# Altium PCB VHF_AMP.PCBDOC (part 6 of 7)
Units mm, origin at the board's own origin, x right, y up, seen from the top; angles counter-clockwise.
Board outline 222.47 x 100.01 mm, 4 copper layers (Top Layer, Int1 (GND), Int2 (PWR), Bottom Layer), stack 1.508 mm thick; 513 components, 284 nets, 1695 pads, 984 vias.
Unrouted connection lines stored in the file: 110.
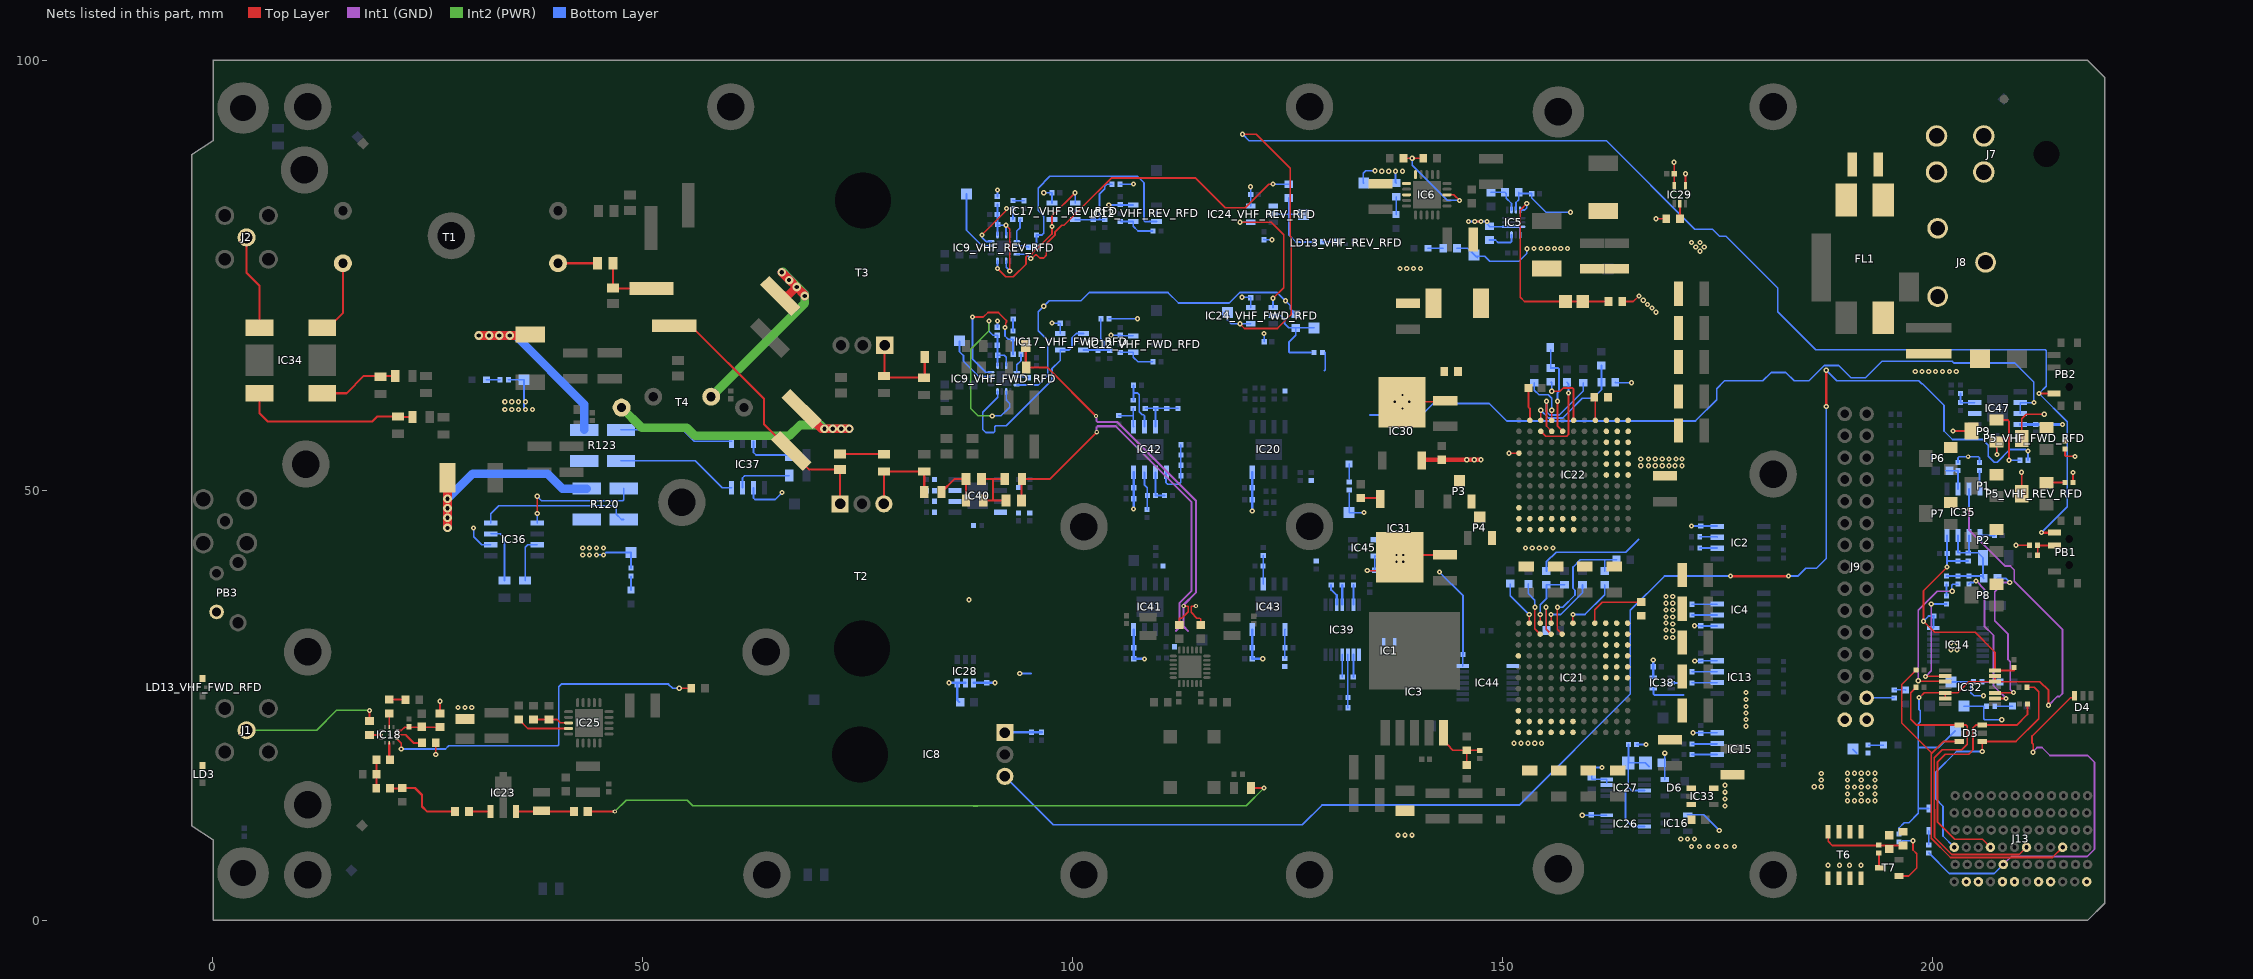
[diagram p6: the nets of this part, all layers, seen from the top]

## Via types
v1: diameter 0.6, hole 0.25, Top Layer to Bottom Layer, tented both sides, 878 vias
v2: diameter 0.6, hole 0.25, Top Layer to Bottom Layer, tented top, 61 vias
v3: diameter 0.5, hole 0.25, Top Layer to Bottom Layer, tented top, 27 vias
v4: diameter 1, hole 0.5, Top Layer to Bottom Layer, tented both sides, 16 vias
v5: diameter 0.5, hole 0.25, Top Layer to Bottom Layer, tented both sides, 2 vias

## Nets (pads, with @x,y where several pads share a name; then routed paths per layer and width w, separated by ;. In a path a pad name is that pad's centre, name@x,y a point inside that pad or via, vN(x,y) a via of type N, cw(c..) or ccw(c..) an arc to the next point about the centre after c; other vN are vias at no path point) (continued)
NetC53_VHF_REV_RFD_2: C53_VHF_REV_RFD.2 IC12_VHF_REV_RFD.3 R24_VHF_REV_RFD.2 | length 26.9
  Bottom Layer w0.2: R24_VHF_REV_RFD.2@95.857,78.279 C53_VHF_REV_RFD.2@95.857,79.694 96.488,79.694 96.7,79.906 96.7,81.874 96.042,82.532 96.042,85.135 97.406,86.5 107.6,86.5 108.357,85.743 108.357,81.378 108.474,81.261 IC12_VHF_REV_RFD.3@109.806,81.261
NetC54_VHF_FWD_RFD_1: C54_VHF_FWD_RFD.1 IC9_VHF_FWD_RFD.4 R31_VHF_FWD_RFD.2 | length 17
  Top Layer w0.2: v1(88.4,70.144) 89.673,70.144 90.205,70.676 91.424,70.676 92.365,69.735 92.365,69.535 92.271,69.441 92.271,69.019 v1(92.194,68.942)
  Bottom Layer w0.2: v1(88.4,70.144) 88.4,65.302 89.963,63.739 IC9_VHF_FWD_RFD.4@90.569,63.739 ; v1(92.194,68.942) 92.194,67.938 92.566,67.566 R31_VHF_FWD_RFD.2@93.125,67.566 C54_VHF_FWD_RFD.1@93.125,65.8
NetC54_VHF_FWD_RFD_2: C54_VHF_FWD_RFD.2 IC9_VHF_FWD_RFD.9 | length 2.3
  Bottom Layer w0.2: IC9_VHF_FWD_RFD.9@93.569,63.739 93.569,64.583 94.05,65.065 C54_VHF_FWD_RFD.2@94.05,65.8
NetC54_VHF_REV_RFD_1: C54_VHF_REV_RFD.1 IC9_VHF_REV_RFD.4 R31_VHF_REV_RFD.2 | length 7.9
  Top Layer w0.2: v1(89.5,79.689) 92.312,82.501 92.312,82.736 v1(92.35,82.774)
  Bottom Layer w0.2: v1(89.5,79.689) 89.538,79.651 89.538,79.364 89.963,78.939 IC9_VHF_REV_RFD.4@90.569,78.939 ; v1(92.35,82.774) 92.358,82.766 R31_VHF_REV_RFD.2@93.125,82.766 93.125,81.521 C54_VHF_REV_RFD.1@93.094,81.489
NetC54_VHF_REV_RFD_2: C54_VHF_REV_RFD.2 IC9_VHF_REV_RFD.9 | length 2.7
  Bottom Layer w0.2: IC9_VHF_REV_RFD.9@93.569,78.939 93.569,80.144 93.944,80.519 93.944,81.439 C54_VHF_REV_RFD.2@93.994,81.489
NetC55_VHF_FWD_RFD_1: C55_VHF_FWD_RFD.1 R31_VHF_FWD_RFD.1 | length 1.5
  Bottom Layer w0.2: R31_VHF_FWD_RFD.1@93.157,68.474 R31_VHF_FWD_RFD.1@93.125,68.506 93.125,69.924 C55_VHF_FWD_RFD.1@93.157,69.924
NetC55_VHF_REV_RFD_1: C55_VHF_REV_RFD.1 R31_VHF_REV_RFD.1 | length 1.3
  Bottom Layer w0.2: R31_VHF_REV_RFD.1@93.125,83.706 93.157,83.674 C55_VHF_REV_RFD.1@94.4,83.674
NetC59_VHF_FWD_RFD_2: C59_VHF_FWD_RFD.2 C60_VHF_FWD_RFD.1 FB2_VHF_FWD_RFD.2 IC9_VHF_FWD_RFD.5 IC9_VHF_FWD_RFD.7 IC9_VHF_FWD_RFD.14 | length 26.3
  Int2 (PWR) w0.2: v1(90.311,69.688) 90.311,68.53 88.2,66.419 88.2,59.51 89.057,58.654 v1(90.7,58.654)
  Bottom Layer w0.2: v1(90.311,69.688) 90.311,68.522 90.796,68.036 FB2_VHF_FWD_RFD.2@91.306,68.036 91.319,68.024 IC9_VHF_FWD_RFD.5@91.319,64.489 ; v1(90.7,58.654) 91.731,58.654 92.738,59.661 92.738,60.096 92.369,60.466 92.369,60.602 92.319,60.652 IC9_VHF_FWD_RFD.14@92.319,61.489 ; C59_VHF_FWD_RFD.2@91.35,65.7 92.1,65.7 92.319,65.481 IC9_VHF_FWD_RFD.7@92.319,64.489
NetC59_VHF_REV_RFD_2: C59_VHF_REV_RFD.2 C60_VHF_REV_RFD.1 FB2_VHF_REV_RFD.2 IC9_VHF_REV_RFD.5 IC9_VHF_REV_RFD.7 IC9_VHF_REV_RFD.14 | length 12.5
  Top Layer w0.2: v1(92.299,80.816) 92.738,80.377 v1(92.738,75.517)
  Bottom Layer w0.2: FB2_VHF_REV_RFD.2@91.306,83.236 91.319,83.224 IC9_VHF_REV_RFD.5@91.319,79.689 ; C59_VHF_REV_RFD.2@91.35,80.9 91.434,80.816 v1(92.299,80.816) 92.299,79.709 IC9_VHF_REV_RFD.7@92.319,79.689 ; IC9_VHF_REV_RFD.14@92.319,76.689 92.319,75.926 92.738,75.507 v1(92.738,75.517)
NetC72_1: C72.1 R15.2 | length 5.1
  Top Layer w0.245: C72.1@73,54.2 R15.2@78.1,54.2
NetC72_2: C72.2 L14.1 L18.1 T2.1 | length 31.9
  Top Layer w0.245: L18.1@53.705,69.136 55.664,69.136 64.172,60.628 64.172,57.674 67.179,54.666 69.445,52.4 C72.2@73,52.4 73,48.444 T2.1@73.02,48.424
NetC73_1: C73.1 C146.2 L18.2 | length 5.6
  Top Layer w0.245: C73.1@46.6,76.4 46.6,73.456 L18.2@49.251,73.456
NetC73_2: C73.2 T1.3 | length 4
  Top Layer w0.245: T1.3@40.219,76.4 44.2,76.4
NetC74_2: C74.2 C78.1 R19.2 R20.1 | length 7.7
  Top Layer w0.245: C78.1@89.46,51.296 90.81,51.296 ; R20.1@89.66,48.796 90.91,48.796 ; C74.2@92.16,48.796 90.91,48.796 ; R19.2@92.16,51.296 90.81,51.296 ; 90.81,51.296 90.81,48.896 90.91,48.796
NetC77_2: C77.2 IC25.14 | length 6.2
  Top Layer w0.2: C77.2@35.643,23.359 36.693,22.309 IC25.14@41.443,22.309
NetC78_2: C78.2 R18.1 R20.2 | length 6
  Top Layer w0.245: R18.1@84.8,49.8 86.296,51.296 C78.2@87.66,51.296 R20.2@87.66,48.796
NetC79_1: C79.1 FL1.3 J7.1 J7.2 J8.2 J8.3
NetC79_2: C79.2 FL1.1 J7.3 J7.4 J8.1
NetC89_2: C89.2 C90.2 IC18.9 L6.1 | length 4.8
  Top Layer w0.2: IC18.9@21.518,22.064 21.993,22.064 22.393,22.464 22.893,22.464 24.393,22.464 L6.1@26.193,22.464
NetC93_1: C93.1 R134.2 R137.2 | length 9.5
  Top Layer w0.245: R134.2@20.693,15.334 22.043,15.334 R137.2@22.093,15.384 23.579,15.384 24.393,14.569 24.393,13.235 24.993,12.635 ; 24.993,12.656 C93.1@28.251,12.656
NetC93_2: C93.2 IC23.1 | length 2.5
  Top Layer w0.245: C93.2@29.851,12.656 IC23.1@32.351,12.656
NetC95_1: C95.1 IC18.11 | length 1.6
  Top Layer w0.2: IC18.11@20.593,22.489 C95.1@20.593,24.064
NetC95_2: C95.2 R95.1 | length 1.9
  Top Layer w0.2: C95.2@20.593,25.664 R95.1@22.493,25.664
NetC96_1: C96.1 J1.1 | length 16.5
  Top Layer w0.245: C96.1@18.293,23.159 v1(18.293,24.414)
  Int2 (PWR) w0.2: J1.1@4,22.1 12.15,22.1 14.464,24.414 v1(18.293,24.414)
NetC96_2: C96.2 IC18.2 | length 1.4
  Top Layer w0.2: C96.2@18.293,21.559 C96.2@18.298,21.564
  Top Layer w0.245: C96.2@18.298,21.564 IC18.2@19.668,21.564
NetC99_1: C99.1 R51.1 R72.2 T6.4 | length 10
  Top Layer w0.2: T6.4@187.895,10.3 187.895,9.188 188.383,8.7 R51.1@196.6,8.7
NetC100_1: C100.1 IC18.5 | length 2
  Top Layer w0.2: C100.1@20.593,18.764 C100.1@20.693,18.664
  Top Layer w0.245: C100.1@20.593,18.764 IC18.5@20.593,20.639
NetC100_2: C100.2 R127.2 R134.1 | length 3.3
  Top Layer w0.245: R134.1@19.093,15.334 C100.2@19.093,18.664
NetC102_1: C102.1 IC23.3 L1.1 | length 6.7
  Top Layer w0.245: IC23.3@35.351,12.656 38.318,12.656 C102.1@42.067,12.656
NetC102_2: C102.2 R101.2 | length 81.8
  Top Layer w0.245: C102.2@43.667,12.656 v3(46.824,12.656) ; R101.2@120.808,15.38 v1(122.308,15.38)
  Int2 (PWR) w0.2: v3(46.824,12.656) 48.139,13.971 55.229,13.971 55.885,13.315 88.491,13.315 88.501,13.305 88.999,13.305 89.009,13.315 120.243,13.315 v1(122.308,15.38)
NetC111_2: C111.2 IC22.K1 | length 3.9
  Top Layer w0.152: C111.2@153.14,62.299 C111.2@153.15,62.289
  Top Layer w0.2: C111.2@153.06,61.9 153.06,59.66 153.22,59.5 IC22.K1@153.22,58.13
NetC122_2: C122.2 IC21.K1 | length 5.5
  Top Layer w0.152: IC21.K1@153.15,34.55 v1(153.15,35.553)
  Bottom Layer w0.152: C122.2@150.94,39.16 150.94,37.763 v1(153.15,35.553)
NetC133_2: C133.2 IC21.J2 | length 6.4
  Top Layer w0.152: v1(153.8,36.4) 153.8,33.9 IC21.J2@154.42,33.28
  Bottom Layer w0.2: C133.2@153.04,39.11 153.04,37.994 153.8,37.234 v1(153.8,36.4)
NetC136_2: C136.2 IC22.J2 | length 9.7
  Top Layer w0.2: IC22.J2@154.49,56.86 155.065,56.285 157.5,56.285 157.7,56.485 v1(157.7,61.3)
  Bottom Layer w0.2: C136.2@157.54,62.56 157.7,62.4 v1(157.7,61.3)
NetC138_2: C138.2 IC35.6 IC35.7 R146.1 R147.1 R148.1 R149.1 R150.1 R152.1 | length 14
  Bottom Layer w0.2: R149.1@201.651,40.023 R148.1@203.001,40.023 R147.1@204.271,40.023 205.731,40.023 R146.1@205.901,39.853 ; IC35.7@203.001,44.753 R152.1@203.001,42.723 R150.1@204.201,42.723 ; IC35.6@204.271,44.753 204.271,42.793 R150.1@204.201,42.723 ; R146.1@206.001,39.753 R146.1@205.901,39.853 ; R150.1@204.201,42.723 205.331,42.723 C138.2@205.901,42.153 R146.1@205.901,39.853
NetC140_2: C140.2 IC35.2 R155.2 | length 3.5
  Bottom Layer w0.2: C140.2@201.651,52.283 R155.2@203.001,52.283 IC35.2@203.001,50.153
NetC141_2: C141.2 IC35.5 | length 1.7
  Bottom Layer w0.2: IC35.5@205.541,44.753 C141.2@207.251,44.753
NetD2_1: D2.1 R142.1 | length 1.6
  Bottom Layer w0.2: R142.1@199.6,8.78 D2.1@199.6,10.4
NetD3_1: D3.1 J13.F3 R141.2 | length 38.6
  Top Layer w0.2: R141.2@198.13,27.1 197.5,26.47 197.5,23.4 198.2,22.7 203.968,22.7 204.086,22.583 204.086,20.491 203.415,19.821 201.176,19.821 200.246,18.891 200.246,12.921 200.273,12.895 200.273,9.655 202.274,7.653 210.126,7.653 J13.F3@210.966,8.493
NetD3_3: D3.3 J13.C3 R140.2 | length 42.2
  Top Layer w0.2: R140.2@198.13,29.1 196.45,27.42 196.45,22.95 199.888,19.512 199.888,19.348 ; D3.3@203.12,20.8 201.339,20.8 199.888,19.348 ; J13.C3@215.166,8.493 213.976,7.303 202.129,7.303 199.888,9.545 199.888,19.348
NetD3_4: D3.4 J13.L3 R144.2 | length 29.6
  Top Layer w0.2: v1(205.82,19.625) D3.4@205.82,20.8 209.748,20.8 212.4,23.452 212.4,26.579 211.879,27.1 R144.2@211.04,27.1
  Bottom Layer w0.2: J13.L3@202.566,8.493 201.255,9.804 201.255,13.274 200.4,14.129 200.4,17.206 202.82,19.625 v1(205.82,19.625)
NetD3_6: D3.6 J13.I3 R143.2 | length 29.8
  Top Layer w0.2: J13.I3@206.766,8.493 205.841,9.418 202.61,9.418 200.623,11.405 200.623,18.442 201.5,19.32 204.244,19.32 204.745,19.821 204.745,22.375 205.07,22.7 D3.6@205.82,22.7 209.836,22.7 211.07,23.934 R143.2@211.07,25.15
NetD4_6: D4.6 J13.H2 R142.2 | length 48.5
  Top Layer w0.2: v1(211.733,19.538) 211.733,20.476 211.614,20.596 211.614,21.426 216.08,25.892 216.363,25.892 216.563,26.092 D4.6@216.563,26.123
  Int1 (GND) w0.2: J13.H2@208.266,6.493 209.186,7.413 218.018,7.413 218.866,8.262 218.866,18.365 218.075,19.157 213.7,19.157 212.766,20.091 212.192,20.091 211.733,19.632 v1(211.733,19.538)
  Bottom Layer w0.2: R142.2@199.6,7.84 201.99,5.45 207.223,5.45 J13.H2@208.266,6.493
NetIC1_4: IC1.4 IC39.1
NetIC2_6: IC2.6 R37.2 | length 2.1
  Bottom Layer w0.2: R37.2@172.97,43.3 175,43.3 IC2.6@175,43.265
NetIC2_7: IC2.7 R35.2 | length 2.1
  Bottom Layer w0.2: R35.2@172.97,44.6 175,44.6 IC2.7@175,44.535
NetIC3_5: IC3.5 R42.1 R43.1 R46.2 | length 7.3
  Top Layer w0.152: IC3.5@143.2,21.8 143.2,20.85 143.649,20.401 144.265,19.785 R43.1@145.9,19.785 ; R42.1@145.9,18.05 R43.1@145.9,19.785 ; R46.2@147.4,19.77 145.915,19.77 R43.1@145.9,19.785
NetIC4_2: IC4.2 R16.2 | length 2.9
  Bottom Layer w0.2: R16.2@172.07,35.5 172.074,35.496 IC4.2@175,35.496
NetIC4_3: IC4.3 R158.2 | length 2.9
  Bottom Layer w0.2: R158.2@172.07,36.766 IC4.3@175,36.766
NetIC5_5: IC5.5 R28.1 R30.2 | length 4
  Bottom Layer w0.2: R30.2@148.677,84.647 R28.1@150.318,84.647 150.466,84.499 150.466,83.964 151.08,83.35 IC5.5@151.08,82.597
NetIC5_10: IC5.10 R17.1 | length 3.5
  Bottom Layer w0.2: R17.1@148.524,79.1 149.224,79.1 149.524,78.8 150.963,78.8 151.08,78.917 IC5.10@151.08,79.697
NetIC6_13: IC6.13 R83.1 R157.2 | length 11.5
  Top Layer w0.2: R157.2@138.882,88.614 v1(139.532,88.614) R83.1@140.682,88.614 ; IC6.13@143.582,84.364 144.382,84.364 v1(145.032,83.714)
  Bottom Layer w0.2: v1(139.532,88.614) 139.532,87.797 143.616,83.714 v1(145.032,83.714)
NetIC8_3: IC8.3 R68.2 | length 170.4
  Top Layer w0.3: v2(176.55,40.023) v2(183.277,40.023) ; v2(187.672,59.728) v2(187.672,63.96)
  Bottom Layer w0.2: IC8.3@92.172,16.743 97.815,11.1 126.751,11.1 129.051,13.4 151.99,13.4 164.9,26.31 164.9,36.044 168.879,40.023 v2(176.55,40.023) ; v2(183.277,40.023) 184.36,40.023 185.277,40.94 186.538,40.94 187.672,42.074 v2(187.672,59.728) ; v2(187.672,63.96) 188.9,62.731 198.443,62.731 198.793,62.381 198.864,62.381 201.376,59.87 201.376,56.891 202.362,55.905 205.861,55.905 206.52,55.247 206.52,53.971 207.222,53.269 207.547,53.269 209.017,54.739 210.872,54.739 211.031,54.58 v2(211.14,54.58) R68.2@211.14,53.5
NetIC9_VHF_FWD_RFD_3: IC9_VHF_FWD_RFD.3 TP7.1 | length 6.4
  Bottom Layer w0.2: TP7.1@86.9,67.3 86.9,66.121 87.358,65.663 87.358,65.006 89.125,63.239 IC9_VHF_FWD_RFD.3@90.569,63.239
NetIC9_VHF_FWD_RFD_10: IC9_VHF_FWD_RFD.10 R24_VHF_FWD_RFD.1 | length 1.4
  Bottom Layer w0.2: IC9_VHF_FWD_RFD.10@93.569,63.239 94.291,63.239 94.4,63.131 94.865,63.131 R24_VHF_FWD_RFD.1@94.917,63.079
NetIC9_VHF_FWD_RFD_12: IC9_VHF_FWD_RFD.12 R22_VHF_FWD_RFD.1 | length 45.1
  Bottom Layer w0.2: IC9_VHF_FWD_RFD.12@93.569,62.239 96.042,62.239 97.15,63.348 97.15,67.458 96.042,68.566 96.042,70.742 v1(96.7,71.4) 97.35,72.05 101.033,72.05 101.982,73 111.13,73 112.356,71.774 118.273,71.774 119.499,73 123.821,73 124.27,72.552 v2(124.789,72.032) 125.339,71.482 125.339,71.095 125.95,70.484 R22_VHF_FWD_RFD.1@126,70.484
NetIC9_VHF_FWD_RFD_16: IC9_VHF_FWD_RFD.16 IC17_VHF_FWD_RFD.1 IC17_VHF_FWD_RFD.4 | length 24.2
  Bottom Layer w0.2: IC9_VHF_FWD_RFD.16@91.319,61.489 91.319,61.302 91.35,61.271 91.35,60.827 89.605,59.082 89.605,57.065 89.946,56.725 90.881,56.725 90.999,56.842 90.999,57.383 91.116,57.5 92.352,57.5 97.644,62.792 97.644,64.131 98.611,65.098 IC17_VHF_FWD_RFD.4@98.611,66.326 99.645,66.326 99.98,66.661 99.98,67.72 100.486,68.226 IC17_VHF_FWD_RFD.1@101.311,68.226
NetIC9_VHF_REV_RFD_3: IC9_VHF_REV_RFD.3 TP6.1 | length 7.8
  Bottom Layer w0.2: TP6.1@87.7,84.45 87.7,80.258 89.519,78.439 IC9_VHF_REV_RFD.3@90.569,78.439
NetIC9_VHF_REV_RFD_10: IC9_VHF_REV_RFD.10 R24_VHF_REV_RFD.1 | length 1.4
  Bottom Layer w0.2: IC9_VHF_REV_RFD.10@93.569,78.439 94.291,78.439 94.4,78.331 94.865,78.331 R24_VHF_REV_RFD.1@94.917,78.279
NetIC9_VHF_REV_RFD_12: IC9_VHF_REV_RFD.12 R22_VHF_REV_RFD.1 | length 39.6
  Top Layer w0.2: v1(95.175,76.936) 95.266,76.936 95.697,77.367 95.863,77.367 96.217,77.013 96.673,77.013 96.995,77.335 96.995,78.665 97.994,79.663 97.994,80.017 98.785,80.808 99.048,80.808 100.95,82.711 100.95,82.727 101.272,83.05 101.289,83.05 104.539,86.3 114.354,86.3 117.8,82.854 120.111,82.854 122.857,85.6 v1(123.356,85.6)
  Bottom Layer w0.2: IC9_VHF_REV_RFD.12@93.569,77.439 94.671,77.439 v1(95.175,76.936) ; v1(123.356,85.6) R22_VHF_REV_RFD.1@125.2,85.6
NetIC9_VHF_REV_RFD_16: IC9_VHF_REV_RFD.16 IC17_VHF_REV_RFD.1 IC17_VHF_REV_RFD.4 | length 18.2
  Top Layer w0.2: v1(91.3,75.8) 92.28,74.82 93.165,74.82 94.625,76.28 94.625,77.163 94.947,77.486 95.321,77.486 97.644,79.808 v1(97.644,80.681) 97.644,81.9 v1(100.344,84.6)
  Bottom Layer w0.2: v1(91.3,75.8) 91.319,75.819 IC9_VHF_REV_RFD.16@91.319,76.689 ; v1(97.644,80.681) IC17_VHF_REV_RFD.4@97.644,81.489 ; IC17_VHF_REV_RFD.1@100.344,83.389 v1(100.344,84.6)
NetIC12_VHF_FWD_RFD_4: IC12_VHF_FWD_RFD.4 R32_VHF_FWD_RFD.2 R33_VHF_FWD_RFD.2 | length 4.6
  Bottom Layer w0.2: R33_VHF_FWD_RFD.2@105.595,66.13 105.664,66.061 IC12_VHF_FWD_RFD.4@107.106,66.061 107.106,65.487 107.65,64.944 R32_VHF_FWD_RFD.2@109.38,64.944
NetIC12_VHF_REV_RFD_4: IC12_VHF_REV_RFD.4 R32_VHF_REV_RFD.2 R33_VHF_REV_RFD.2 | length 4.6
  Bottom Layer w0.2: R33_VHF_REV_RFD.2@105.595,81.33 105.664,81.261 IC12_VHF_REV_RFD.4@107.106,81.261 107.106,80.687 107.65,80.144 R32_VHF_REV_RFD.2@109.38,80.144
NetIC13_6: IC13.6 R80.2 | length 2.9
  Bottom Layer w0.2: R80.2@172.07,27.633 IC13.6@175,27.633
NetIC13_7: IC13.7 R39.2 | length 2.9
  Bottom Layer w0.2: R39.2@172.07,28.903 IC13.7@175,28.903
NetIC15_6: IC15.6 R169.2 | length 2.9
  Bottom Layer w0.2: R169.2@172.06,19.284 174.99,19.284 IC15.6@175,19.274
NetIC15_7: IC15.7 R45.2 | length 2.9
  Bottom Layer w0.2: R45.2@172.07,20.5 174.956,20.5 IC15.7@175,20.544
NetIC17_VHF_FWD_RFD_3: IC17_VHF_FWD_RFD.3 R53_VHF_FWD_RFD.2 R54_VHF_FWD_RFD.2 R56_VHF_FWD_RFD.2 | length 6.8
  Bottom Layer w0.2: IC17_VHF_FWD_RFD.3@101.311,66.326 101.331,66.306 103.7,66.306 ; R56_VHF_FWD_RFD.2@103.33,69.94 103.33,67.628 103.7,67.258 103.7,66.306 ; R53_VHF_FWD_RFD.2@104.36,66.306 103.7,66.306
NetIC17_VHF_REV_RFD_3: IC17_VHF_REV_RFD.3 R53_VHF_REV_RFD.2 R54_VHF_REV_RFD.2 R56_VHF_REV_RFD.2 | length 8.5
  Bottom Layer w0.2: IC17_VHF_REV_RFD.3@100.344,81.489 100.363,81.47 103.167,81.47 ; R53_VHF_REV_RFD.2@103.8,81.47 103.167,81.47 ; R56_VHF_REV_RFD.2@104.63,85.6 104.054,85.6 103.794,85.34 103.794,85.064 103.167,84.437 103.167,81.47
NetIC18_7: IC18.7 R114.2 | length 42.4
  Top Layer w0.2: IC18.7@21.518,21.064 21.993,20.589 v1(21.993,19.914) ; v1(54.31,26.981) R114.2@55.71,26.981
  Bottom Layer w0.2: v1(21.993,19.914) 27.129,19.914 27.498,20.283 40.176,20.283 40.293,20.4 40.293,27.172 40.589,27.468 53.052,27.468 53.539,26.981 v1(54.31,26.981)
NetIC18_8: IC18.8 R99.2 | length 3.3
  Top Layer w0.2: IC18.8@21.518,21.564 22.493,21.564 22.593,21.464
  Top Layer w0.245: 22.593,21.464 23.418,20.639 R99.2@24.393,20.639
NetIC21_D1: IC21.D1 R66.1 | length 7.3
  Top Layer w0.152: IC21.D1@160.77,34.55 160.77,36.124 161.646,37 R66.1@166.172,37
NetIC21_F1: IC21.F1 R73.1 | length 6.8
  Top Layer w0.152: IC21.F1@158.23,34.55 v1(158.23,35.553)
  Bottom Layer w0.2: v1(158.23,35.553) 159.617,35.553 161.93,37.866 R73.1@161.93,39.01
NetIC21_G2: IC21.G2 R73.2 R74.2 | length 16.1
  Top Layer w0.152: v1(156.44,36.4) 156.41,36.37 156.41,34.779 156.409,34.778 156.409,33.831 IC21.G2@156.96,33.28
  Bottom Layer w0.2: v1(156.44,36.4) 157.042,36.4 158.468,37.826 158.468,38.362 158.23,38.6 158.23,41.07 159.085,41.926 161.93,41.926 ; R73.2@161.93,40.61 161.93,41.926 ; R74.2@163.3,41.926 161.93,41.926
NetIC21_H1: IC21.H1 R69.2 | length 6.6
  Top Layer w0.152: IC21.H1@155.69,34.55 v1(155.69,35.553)
  Bottom Layer w0.2: v1(155.69,35.553) 156.79,35.553 159.34,38.102 R69.2@159.34,39.01
NetIC21_H2: IC21.H2 R71.2 | length 6.1
  Top Layer w0.152: v1(155.106,36.4) 155.106,33.864 IC21.H2@155.69,33.28
  Bottom Layer w0.152: R71.2@155.106,33.738 R71.2@155.145,33.7
  Bottom Layer w0.2: R71.2@155.106,33.738 v1(155.106,36.4)
NetIC21_J1: IC21.J1 P3.2 R67.1 R70.2 | length 6.9
  Top Layer w0.152: IC21.J1@154.42,34.55 v1(154.42,35.553)
  Bottom Layer w0.2: v1(154.42,35.553) 154.42,36.682 155.14,37.402 R67.1@155.14,39.01 R70.2@157.24,39.01
NetIC21_L4: IC21.L4 R126.2
NetIC22_D1: IC22.D1 R76.1 | length 2.8
  Top Layer w0.152: R76.1@160.7,60.821 160.84,60.821 IC22.D1@160.84,58.13
NetIC22_F1: IC22.F1 R86.1 | length 7.5
  Top Layer w0.2: v1(155.76,61.52) 156.705,61.52 157.085,61.9 158.183,61.9 158.3,61.783 IC22.F1@158.3,58.13
  Bottom Layer w0.152: R86.1@155.645,62.61 R86.1@155.76,62.495
  Bottom Layer w0.2: v1(155.76,61.52) R86.1@155.76,62.495
NetIC22_G2: IC22.G2 R86.2 R87.2 | length 10.7
  Top Layer w0.2: v1(156.44,60.35) 156.44,57.45 IC22.G2@157.03,56.86
  Bottom Layer w0.2: R87.2@155.64,66.31 155.64,64.215 R86.2@155.645,64.21 156.511,64.21 156.6,64.121 156.6,61.5 156.44,61.34 v1(156.44,60.35)
NetIC22_H1: IC22.H1 R78.2 | length 5.9
  Top Layer w0.2: IC22.H1@155.76,58.13 v1(155.76,59.3)
  Bottom Layer w0.2: R78.2@153.74,62.51 153.74,61.635 154.275,61.1 155.361,61.1 155.76,60.701 v1(155.76,59.3)
NetIC22_H2: IC22.H2 R84.2 | length 11.5
  Top Layer w0.2: v1(155.15,60.35) 155.15,57.47 IC22.H2@155.76,56.86
  Bottom Layer w0.2: v1(155.15,60.35) 155.15,59.132 155.532,58.75 156.64,58.75 159.44,61.55 R84.2@159.44,62.51
NetIC22_J1: IC22.J1 P4.2 R77.1 R79.2 | length 12.8
  Top Layer w0.2: IC22.J1@154.49,58.13 v1(154.49,59.3)
  Bottom Layer w0.2: v1(154.49,59.3) 154.49,59.297 155.387,58.4 157.019,58.4 159.32,60.701 160.531,60.701 161.54,61.71 R77.1@161.54,62.543 R79.2@161.54,64.51
NetIC24_VHF_FWD_RFD_1: IC24_VHF_FWD_RFD.1 IC24_VHF_REV_RFD.4 | length 15.9
  Top Layer w0.2: v1(119.5,81.161) 123.158,81.161 124.6,79.718 124.6,73.567 v1(123.356,72.324)
  Bottom Layer w0.2: v1(119.5,81.161) IC24_VHF_REV_RFD.4@120.756,81.161 ; IC24_VHF_FWD_RFD.1@123.356,71.261 v1(123.356,72.324)
NetIC24_VHF_FWD_RFD_2: IC24_VHF_FWD_RFD.2 R22_VHF_FWD_RFD.2 R178_VHF_FWD_RFD.1 TP8_VHF_FWD_RFD.1 | length 11.4
  Bottom Layer w0.2: IC24_VHF_FWD_RFD.2@123.356,70.311 124.327,70.311 124.698,69.94 124.698,69.361 125.174,68.884 R22_VHF_FWD_RFD.2@126,68.884 ; 127.809,66.032 125.268,66.032 125.2,66.1 125.2,67.227 126,68.027 R22_VHF_FWD_RFD.2@126,68.884 ; TP8_VHF_FWD_RFD.1@128.105,68.884 R22_VHF_FWD_RFD.2@126,68.884
NetIC24_VHF_REV_RFD_2: IC24_VHF_REV_RFD.2 R22_VHF_REV_RFD.2 R178_VHF_REV_RFD.1 TP8_VHF_REV_RFD.1 | length 10.8
  Bottom Layer w0.2: IC24_VHF_REV_RFD.2@123.356,82.111 125.2,82.111 ; R22_VHF_REV_RFD.2@125.2,84 125.2,82.111 ; TP8_VHF_REV_RFD.1@126.89,82.061 126.84,82.111 125.2,82.111 ; 127.794,78.869 126.03,78.869 125.2,79.699 125.2,82.111
NetIC25_13: IC25.13 R130.1 R131.2 | length 4.2
  Top Layer w0.2: R130.1@37.363,23.359 40.094,23.359 40.344,23.109 40.493,22.959 IC25.13@41.443,22.959
NetIC26_3: IC26.3 IC27.3 R61.2 TP13.1 | length 16.1
  Bottom Layer w0.2: R61.2@164.691,20.445 164.691,18.353 TP13.1@164.651,18.312 ; IC27.3@166.553,15.087 165.034,15.087 164.651,15.471 ; IC26.3@166.555,10.918 165.12,10.918 164.345,11.694 164.345,15.165 164.651,15.471 ; TP13.1@167.104,17.859 TP13.1@166.651,18.312 TP13.1@164.651,18.312 ; 164.651,15.471 TP13.1@164.651,18.312
NetIC29_2: IC29.2 R115.1 | length 1.8
  Top Layer w0.2: R115.1@170.665,81.572 IC29.2@170.665,83.322
NetIC34_1: IC34.1 T1.4 | length 8.9
  Top Layer w0.245: IC34.1@12.793,68.91 13.413,69.53 14.127,69.53 15.2,70.602 T1.4@15.2,76.4
NetIC34_4: IC34.4 R111_VHF_REV_RFD.1 R112_VHF_REV_RFD.2 | length 9.3
  Top Layer w0.245: IC34.4@12.793,61.29 15.634,61.29 17.644,63.3 R111_VHF_REV_RFD.1@21.286,63.3
NetIC34_5: IC34.5 R111_VHF_FWD_RFD.1 R112_VHF_FWD_RFD.2 | length 20
  Top Layer w0.245: IC34.5@5.507,60.514 5.507,58.951 6.459,58 18.625,58 19.198,58.573 R112_VHF_FWD_RFD.2@21.586,58.573 ; R112_VHF_FWD_RFD.2@21.586,58.514 R111_VHF_FWD_RFD.1@23.286,58.514
NetIC34_8: IC34.8 J2.1 | length 11.1
  Top Layer w0.245: J2.1@4,79.4 4,75.3 5.507,73.793 IC34.8@5.507,68.91
NetIC35_4: IC35.4 R154.1 | length 2.1
  Bottom Layer w0.2: R154.1@205.501,52.283 205.501,50.193 IC35.4@205.541,50.153
NetIC36_1: IC36.1 R120.V1 | length 14.7
  Top Layer w0.2: v1(37.8,47.3) v1(37.8,49.3)
  Bottom Layer w0.2: IC36.1@37.8,46.205 v1(37.8,47.3) ; v1(37.8,49.3) 38.3,48.8 47.733,48.8 47.85,48.917 R120.V1@47.85,50.2
NetIC36_3: IC36.3 R122.1 | length 5.4
  Bottom Layer w0.2: R122.1@36.4,39.5 36.4,43.365 36.7,43.665 IC36.3@37.8,43.665
NetIC36_7: IC36.7 R121.1 | length 6.7
  Bottom Layer w0.2: IC36.7@32.4,44.935 33.5,44.935 34,44.435 R121.1@34,39.5
NetIC36_8: IC36.8 R120.V2 | length 18.1
  Bottom Layer w0.2: IC36.8@32.4,46.205 32.4,47.256 33.344,48.2 46.883,48.2 47,48.083 47,47.2 47.6,46.6 R120.V2@47.85,46.6
NetIC37_1: IC37.1 R123.V1 | length 13.4
  Bottom Layer w0.2: R123.V1@47.546,57.028 54.717,57.028 56.046,55.7 IC37.1@60.404,55.7
NetIC37_3: IC37.3 R125.1 | length 5.6
  Bottom Layer w0.2: IC37.3@62.944,55.7 62.944,54.4 63.244,54.1 R125.1@67.109,54.1
NetIC37_7: IC37.7 R124.1 | length 6.7
  Bottom Layer w0.2: IC37.7@61.674,50.3 61.674,51.434 61.94,51.7 R124.1@67.109,51.7
NetIC37_8: IC37.8 R123.V2 | length 14.2
  Bottom Layer w0.2: R123.V2@47.546,53.428 56.181,53.428 59.309,50.3 IC37.8@60.404,50.3
NetIC38_2: IC38.2 R80.1 | length 1.5
  Bottom Layer w0.2: IC38.2@169.65,27.6 R80.1@171.13,27.6
NetIC39_2: IC39.2 R105.2 | length 2.6
  Bottom Layer w0.2: R105.2@132.7,28.27 132.7,30.898 IC39.2@132.707,30.905
NetIC39_3: IC39.3 R185.2 R187.1 | length 6.2
  Bottom Layer w0.2: IC39.3@132.057,30.905 132.057,24.713 R185.2@132.07,24.7
NetIC39_4: IC39.4 R91.1 | length 2.6
  Bottom Layer w0.2: R91.1@131.4,28.27 131.4,30.898 IC39.4@131.407,30.905
NetIC39_10: IC39.10 R40.1 | length 2.5
  Bottom Layer w0.25: R40.1@130.107,38.975 130.107,38.442 130.757,37.792 IC39.10@130.757,36.705
NetIC39_11: IC39.11 R41.2 | length 2.3
  Bottom Layer w0.25: R41.2@131.4,38.975 131.4,36.712 IC39.11@131.407,36.705
NetIC39_13: IC39.13 R48.2 | length 2.3
  Bottom Layer w0.25: IC39.13@132.707,36.705 R48.2@132.707,38.975
NetIC40_2: IC40.2 R75.2 R184.1 R186.1
NetIC40_3: IC40.3 R64.2 R188.1
NetIC42_1: IC42.1 R81.1 R195.1 | length 3.8
  Bottom Layer w0.2: R81.1@105.4,58.67 105.413,58.683 107.1,58.683 ; R195.1@107.1,59.53 107.1,58.683 ; IC42.1@107.14,57.405 107.1,57.445 107.1,58.683
NetIC42_2: IC42.2 R194.1 R195.2 | length 6.5
  Bottom Layer w0.2: R195.2@107.1,60.47 107.13,60.5 R194.1@107.13,62.2 ; 107.14,61.302 107.619,61.302 107.8,61.121 107.8,59.128 108.128,58.8 108.293,58.8 108.41,58.683 IC42.2@108.41,57.405
NetIC42_3: IC42.3 R94.1 R196.1 R198.1 R199.1 | length 5.9
  Bottom Layer w0.2: R199.1@108.5,59.53 R198.1@109.7,59.53 ; IC42.3@109.68,57.405 109.7,57.425 R198.1@109.7,59.53 ; R94.1@112.3,59.53 R196.1@111,59.53 R198.1@109.7,59.53
NetIC42_5: IC42.5 R96.1 R207.1 R208.1 R211.1 | length 7.5
  Bottom Layer w0.2: IC42.5@110.95,52.105 110.9,52.055 110.9,50.9 111.1,50.7 112.4,50.7 112.63,50.93 R96.1@112.63,52.9 R207.1@112.63,54.1 R211.1@112.63,55.3
NetIC42_6: IC42.6 R205.1 R206.2 | length 3.8
  Bottom Layer w0.2: R206.2@109.67,49.4 R205.1@110.73,49.4 ; IC42.6@109.68,52.105 109.68,49.557 R206.2@109.806,49.43
NetIC42_7: IC42.7 R90.1 R206.1 | length 4.5
  Bottom Layer w0.2: IC42.7@108.41,52.105 108.4,52.095 108.4,50.631 108.73,50.301 R206.1@108.73,49.4 R90.1@108.73,47.77
NetIC43_2: IC43.2 R202.1 R203.2 | length 3.3
  Bottom Layer w0.2: R202.1@122.2,42.43 122.2,39.115 IC43.2@122.21,39.105
NetIC43_5: IC43.5 R213.2 R214.1 | length 3.4
  Bottom Layer w0.2: R213.2@124.7,30.47 124.7,33.755 IC43.5@124.75,33.805
NetIC47_2: IC47.2 P9.2 | length 2.2
  Top Layer w0.2: v2(202.409,56.891) P9.2@204.562,56.891
NetIC47_3: IC47.3 R89.2 R93.1 | length 2.7
  Bottom Layer w0.2: R89.2@203.297,61.282 R93.1@203.297,60.214 203.317,60.194 IC47.3@204.951,60.194
NetIC47_6: IC47.6 IC47.7 | length 90.5
  Bottom Layer w0.2: 134.6,58.75 140.646,58.75 141.991,60.095 148.49,60.095 150.535,58.05 172.465,58.05 174.95,60.535 174.95,61.828 175.854,62.731 180.304,62.731 181.272,63.7 182.985,63.7 183.953,62.731 185.666,62.731 187.444,64.51 189.13,64.51 190.559,63.081 192.245,63.081 194.159,64.995 202.312,64.995 202.507,64.8 209.606,64.8 211.818,62.588 v2(211.818,60.194) IC47.6@210.251,60.194 IC47.7@210.251,58.924
NetL2_1: L2.1 R120.I1 | length 27.3
  Top Layer w1: v4(27.37,45.625) v4(27.37,46.825) v4(27.37,47.925) v4(27.37,49.02) L2.1@27.37,51.448
  Bottom Layer w1: v4(27.37,45.625) v4(27.37,46.825) v4(27.37,47.925) v4(27.37,49.02) 30.286,51.936 38.982,51.936 40.718,50.2 R120.I1@43.55,50.2
NetL3_1: L3.1 R123.I1 | length 24.7
  Top Layer w1: v4(31,68) v4(32.2,68) v4(33.4,68) v4(34.6,68) 37,68 L3.1@37,68.113
  Bottom Layer w1: v4(31,68) v4(32.2,68) v4(33.4,68) 35.261,68 43.246,60.015 R123.I1@43.246,57.028
NetL13_1: L13.1 T4.4 | length 26.3
  Top Layer w1: L13.1@66.059,72.597 66.911,72.597 v4@67.945,73.631 ; v4(66.233,75.344) 67.108,74.469 v4@67.945,73.631 ; v4(67.958,73.644) v4@67.945,73.631 ; v4(68.9,72.597) 68.9,72.676 v4@67.945,73.631
  Int2 (PWR) w1: T4.4@58.022,60.884 68.9,71.762 68.9,72.825 67.225,74.5 66.648,75.077 66.648,75.127 v4@66.375,75.4
  other v4: 67.083,74.444
NetL14_2: L14.2 T4.1 | length 35
  Top Layer w1: L14.2@68.546,59.462 70.84,57.168 v4(73.156,57.168) v4(74.067,57.168) ; L14.2@69.993,58.235 L14.2@70.005,58.235
  Int2 (PWR) w1: T4.1@47.608,59.614 49.947,57.275 55.175,57.275 56.119,56.332 67.106,56.332 68.37,57.595 70.769,57.595 v4(71.197,57.168) v4(72.173,57.168) v4(73.156,57.168) v4(74.067,57.168)
NetLD1_2: LD1.2 R106.1 | length 1.8
  Bottom Layer w0.2: LD1.2@141.38,78.138 R106.1@143.156,78.137
NetLD2_2: LD2.2 R216.1 | length 2.1
  Bottom Layer w0.2: LD2.2@137.67,82.077 R216.1@137.67,84.127
NetLD3_2: LD3.2 R65.2
NetLD4_2: LD4.2 R218.1 | length 1.8
  Bottom Layer w0.152: R218.1@192.542,20.374 LD4.2@194.357,20.374
NetLD5_2: LD5.2 R108.2 | length 1.8
  Bottom Layer w0.2: 206.096,27.719 LD5.2@207.87,27.719
NetLD6_2: LD6.2 R109.2 | length 1.8
  Bottom Layer w0.2: 207.6,24.9 LD6.2@209.35,24.9
NetLD7_2: LD7.2 R110.2 | length 1.7
  Bottom Layer w0.2: 132.2,51.3 LD7.2@132.2,53.05
NetLD9_2: LD9.2 R179.1 | length 1.3
  Bottom Layer w0.2: R179.1@195.587,26.806 196.875,26.806 LD9.2@196.89,26.791
NetLD11_2: LD11.2 R180.1 | length 1.6
  Bottom Layer w0.2: LD11.2@48.693,38.42 R180.1@48.693,40.017
NetLD12_2: LD12.2 R23.1 | length 1.6
  Bottom Layer w0.2: LD12.2@31.885,62.855 R23.1@33.49,62.855
NetLD13_VHF_FWD_RFD_2: LD13_VHF_FWD_RFD.2 R178_VHF_FWD_RFD.2 | length 2.1
  Bottom Layer w0.2: 129.335,63.931 129.409,64.006 129.409,66.032
NetLD13_VHF_REV_RFD_2: LD13_VHF_REV_RFD.2 R178_VHF_REV_RFD.2 | length 1.8
  Bottom Layer w0.2: R178_VHF_REV_RFD.2@129.106,78.897 130.791,78.897 LD13_VHF_REV_RFD.2@130.842,78.948
NetP5_VHF_FWD_RFD_2: P5_VHF_FWD_RFD.2 R56_VHF_FWD_RFD.1 | length 8.4
  Top Layer w0.2: P5_VHF_FWD_RFD.2@210.4,56.03 210.4,58.3 210.94,58.84 v2(213.023,58.84)
  Bottom Layer w0.2: R56_VHF_FWD_RFD.1@104.27,69.94 v2(107.584,69.94)
NetP5_VHF_FWD_RFD_3: P5_VHF_FWD_RFD.3 R55_VHF_FWD_RFD.2
NetP5_VHF_REV_RFD_2: P5_VHF_REV_RFD.2 R56_VHF_REV_RFD.1 | length 4.1
  Top Layer w0.2: P5_VHF_REV_RFD.2@210.4,49.6 v2(210.4,52.09)
  Bottom Layer w0.2: R56_VHF_REV_RFD.1@105.57,85.6 106.428,85.6 106.44,85.588 107.128,85.588 v2(107.14,85.6)
NetP5_VHF_REV_RFD_3: P5_VHF_REV_RFD.3 R55_VHF_REV_RFD.2 | length 2.1
  Top Layer w0.2: P5_VHF_REV_RFD.3@213.3,50.87 213.33,50.9 R55_VHF_REV_RFD.2@215.43,50.9
NetP9_1: P9.1 R88.2 | length 2.7
  Top Layer w0.2: P9.1@207.462,55.621 207.514,55.569 v2(207.514,54.178)
  Bottom Layer w0.2: v2(207.514,54.178) R88.2@207.514,55.43
NetP9_3: P9.3 R68.1 | length 7.3
  Top Layer w0.2: P9.3@207.462,58.161 208.81,58.161 208.928,58.044 v2(208.928,53.5)
  Bottom Layer w0.2: v2(208.928,53.5) R68.1@210.2,53.5
NetPB1_2: PB1.2 R1.2 R2.2 | length 3.1
  Top Layer w0.2: R1.2@212.263,42.457 R2.2@212.263,43.614 212.303,43.574 PB1.2@214.197,43.574
NetR10_1: R10.1 R11.2 R14.2 T3.1 | length 11
  Top Layer w0.245: R10.1@78.1,63.096 78.2,63.196 R10.1@78.2,63.2 ; R10.1@78.1,63.3 R10.1@78.2,63.2 ; T3.1@78.2,66.868 R10.1@78.2,63.2 ; R11.2@82.859,65.496 82.859,63.195 R14.2@82.76,63.096 78.304,63.096 R10.1@78.2,63.2
NetR15_1: R15.1 R18.2 R21.2 T2.3 | length 10.9
  Top Layer w0.245: T2.3@78.1,48.424 R15.1@78.1,52.2 R21.2@82.8,52.2 R18.2@82.8,49.8
NetR72_1: R72.1 T7.3 | length 1.8
  Top Layer w0.2: R72.1@193.8,7.83 193.8,6.15 T7.3@193.85,6.1
NetR145_1: R145.1 R149.2 | length 1.4
  Bottom Layer w0.2: R145.1@201.651,37.723 R149.2@201.651,39.083
NetR153_2: R153.2 T7.1 | length 7.5
  Top Layer w0.2: T7.1@196.15,5.15 197.274,5.15 198.2,6.076 198.2,7.731 197.762,8.169 v2(197.762,9.245)
  Bottom Layer w0.2: R153.2@196.137,9.105 196.447,9.105 196.587,9.245 v2(197.762,9.245)
NSHDN: IC22.L4 IC29.4 R126.1 | length 2.5
  Top Layer w0.152: v1(150.8,54.3) 150.82,54.32 IC22.L4@151.95,54.32
  Top Layer w0.2: IC29.4@171.315,85.422 v1(171.315,86.799)
OVC_DIS: IC24_VHF_REV_RFD.1 IC45.4
P2V5REF: C154.2 IC28.5 IC28.6 P1.3 P2.3 P6.3 P7.3 P8.3 R189.1 R190.1 R193.1 R200.1 R209.1 R213.1 | length 5.5
  Bottom Layer w0.2: v1(93.905,28.7) 95.2,28.7
  Bottom Layer w0.25: v1(85.694,27.617) IC28.6@86.634,27.617 ; C154.2@86.883,25.368 86.634,25.618 IC28.6@86.634,27.617 ; IC28.5@87.584,27.617 IC28.6@86.634,27.617
P3V3: C10.2 C32.2 C42.2 C62.2 C64.2 C153.1 C161.2 C162.2 IC1.5 IC2.8 IC4.1 IC13.8 IC15.8 IC28.4 IC29.5 IC30.3 IC38.5 L6.2 R97.1 R99.1 R108.1 TP3.1 | length 32.4
  Top Layer w0.2: v1(25.993,19.264) R99.1@25.993,20.639 ; L6.2@26.493,24.064 v1(26.493,25.464) ; v1(139.2,60.3) C42.2@142.98,60.3 ; R97.1@163.96,71.947 165.25,71.947 v1(165.9,72.597) ; v1(169.989,88.137) 170.002,88.124 170.002,85.435 IC29.5@170.015,85.422
  Bottom Layer w0.2: v1(172.029,45.85) C62.2@173.1,45.85 175,45.85 IC2.8@175,45.805 ; v1(172.187,21.814) IC15.8@175,21.814 ; v1(172.347,34.25) C10.2@173.1,34.25 173.1,34.226 IC4.1@175,34.226 ; v1(172.38,30.134) 173.084,30.134 C32.2@173.1,30.15 173.1,30.173 IC13.8@175,30.173 ; TP3.1@202.195,27.72 204.495,27.72 204.495,26.471 204.853,26.113 v1(205.962,26.113) ; 204.5,27.665 204.5,27.765
  Bottom Layer w0.25: IC28.4@88.534,27.617 C153.1@90.083,27.618 ; C153.1@90.083,27.618 v1(91.026,27.618) ; IC38.5@167.55,28.25 167.571,28.271 v2(167.571,30.25)
  other v1: 172.013,8.583 172.95,8.583 174,8.583 175,8.583 176,8.583 177,8.583 178.35,22.56 178.35,23.349 178.35,24.12 178.35,24.86 178.35,25.686 178.35,26.474 138.4,59.5 137.5,60.3 138.4,61.1 167.9,70.7 167.4,71.2 166.9,71.6 166.4,72.1 172.997,77.8 172.497,78.3 173.5,78.3 171.997,78.797 173,78.8
P3V3_MP: C22.2 C65.2 C67.2 C75.2 C76.2 C139.2 C142.2 D6.4 IC14.14 IC16.4 IC26.8 IC27.7 IC27.8 IC32.14 IC33.5 IC35.8 J9.30 R61.1 R109.1 R150.2 R152.2 R154.2 R155.1 TP4.1 | length 56.2
  Top Layer w0.2: v1(198.979,34.779) 200.278,33.48 204.995,33.48 207.3,31.175 IC32.14@207.3,29.05 209.5,29.05 209.52,29.03 ; v1@198.98,34.78 198.98,38.332 v1(201.731,41.083)
  Bottom Layer w0.2: v1(159.3,12.218) IC26.8@162.155,12.218 ; C75.2@160.426,16.687 160.426,16.387 IC27.8@162.153,16.387 162.153,15.962 ; C75.2@160.426,16.712 160.426,17.404 160.79,17.768 v1(161.61,17.768) ; R61.1@165.631,20.445 v1(166.705,20.445) ; D6.4@168.903,16.362 168.903,18.312 v1(168.903,19.434) ; IC16.4@171.553,12.262 173.438,12.262 v1(175.245,10.455) ; v1@198.989,34.789 199.578,35.378 C142.2@200.205,35.378 ; IC14.14@200.095,33.97 200.15,34.025 C142.2@200.15,35.323 ; v1(201.731,41.083) 201.731,41.783 ; IC35.8@201.731,44.753 201.731,41.783 ; R155.1@203.001,53.223 203.001,53.796 203.118,53.913 v3(204.18,53.913) 205.384,53.913 205.501,53.796 R154.2@205.501,53.223 ; TP4.1@203.7,24.9 206,24.9 206,23.437 206.117,23.32 v1(208.088,23.32) ; R150.2@204.201,41.783 R152.2@203.001,41.783 201.731,41.783
  other v1: 175.9,13.3 175.9,14.1 175.9,14.9 186.278,15.538 187.1,15.538 175.9,15.7 187.1,16.3 187.1,17.055 202.166,31.456 202.87,31.456 202.166,32.246 202.862,32.246
P3V3A: C5.2 C9.1 C56_VHF_FWD_RFD.2 C56_VHF_REV_RFD.2 C57_VHF_FWD_RFD.2 C57_VHF_REV_RFD.2 C61_VHF_FWD_RFD.2 C61_VHF_REV_RFD.2 C63.2 C245_VHF_FWD_RFD.1 C245_VHF_REV_RFD.1 FB2_VHF_FWD_RFD.1 FB2_VHF_REV_RFD.1 IC12_VHF_FWD_RFD.5 IC12_VHF_REV_RFD.5 IC17_VHF_FWD_RFD.5 IC17_VHF_REV_RFD.5 IC24_VHF_FWD_RFD.5 IC24_VHF_REV_RFD.5 IC31.3 IC44.14 IC45.5 PB2.1 PB3.1 R55_VHF_FWD_RFD.1 R55_VHF_REV_RFD.1 R110.1 TP5.1 | length 47.6
  Top Layer w0.2: v2@134.25,40.66 136.017,40.66 IC31.3@136.877,39.8 ; IC31.3@138.1,42.2 138.385,42.485 v1(138.5,42.485) C63.2@142.98,42.485 ; R55_VHF_FWD_RFD.1@215.43,54.819 215.43,54.061 215.547,53.944 216.582,53.944 v2(216.612,53.913) ; R55_VHF_REV_RFD.1@216.37,50.9 v2(216.37,52.077)
  Bottom Layer w0.2: v1(91.3,69.7) 91.306,69.694 FB2_VHF_FWD_RFD.1@91.306,68.956 ; v1(91.3,84.9) 91.306,84.894 FB2_VHF_REV_RFD.1@91.306,84.156 ; v1(96.7,84.6) C57_VHF_REV_RFD.2@97.65,84.6 97.65,83.396 IC17_VHF_REV_RFD.5@97.644,83.389 ; v1(97.668,69.436) C57_VHF_FWD_RFD.2@98.618,69.436 98.618,68.232 IC17_VHF_FWD_RFD.5@98.611,68.226 ; v1(104.26,83.161) 105.532,83.161 C61_VHF_REV_RFD.2@105.595,83.224 105.658,83.161 IC12_VHF_REV_RFD.5@107.106,83.161 ; v1(104.5,68.024) C61_VHF_FWD_RFD.2@105.595,68.024 105.658,67.961 IC12_VHF_FWD_RFD.5@107.106,67.961 ; v2(119.727,72.45) 120.7,72.45 C245_VHF_FWD_RFD.1@120.75,72.4 120.75,71.267 IC24_VHF_FWD_RFD.5@120.756,71.261 ; v1(120.75,85.3) 120.756,85.294 IC24_VHF_REV_RFD.5@120.756,83.061 ; C56_VHF_REV_RFD.2@122.306,79.15 122.333,79.124 v1(123.216,79.124) ; C56_VHF_FWD_RFD.2@122.316,67.276 v1(122.316,68.25) ; 132.2,49.7 TP5.1@132.2,47.4 v1(133.921,47.4) ; v2(134.3,40.66) C9.1@135.161,40.66 ; C9.1@135.011,40.66 C9.1@135.07,40.719 ; C9.1@135.17,40.719 135.17,42.299 IC45.5@135.221,42.35 ; v2(142.716,40.484) 145.45,37.75 C5.2@145.45,30.9 145.399,30.9 IC44.14@145.399,29.55
  other v1: 137.7,41.685 138.5,41.685 137.7,42.485
P5V0A: C12.2 C27.2 C30.2 C49.2 C58.2 C69.2 C71.2 C86.2 C88.2 C104.2 C107.2 C112.2 C113.2 C114.2 C135.2 IC6.1 IC6.3 IC6.20 IC8.1 IC20.8 IC36.6 IC37.6 IC40.8 IC41.8 IC42.8 IC43.8 IC47.8 R64.1 R216.2 TP16.1 | length 39.6
  Bottom Layer w0.2: v1(30.4,45.62) 30.42,45.6 30.42,44.598 31.354,43.665 IC36.6@32.4,43.665 ; IC37.6@62.944,50.3 62.944,49.102 63.12,48.927 65.471,48.927 66.26,49.716 v1(66.26,49.75) ; TP16.1@133.9,85.722 133.857,85.764 133.857,86.857 134.15,87.15 v1(135.2,87.15) ; v1(137.6,87.1) 137.6,85.797 R216.2@137.67,85.727
  Bottom Layer w0.3: IC8.1@92.172,21.823 92.199,21.85 C49.2@95.26,21.85 C71.2@96.43,21.85 ; IC41.8@107.14,33.805 107.14,30.41 C107.2@107.15,30.4 v2(108.4,30.4) ; v2(107.14,47.81) IC42.8@107.14,52.105 ; IC43.8@120.94,33.805 120.94,30.4 120.945,30.405 122.161,30.405 v2(122.166,30.41) ; v2(120.94,47.6) IC20.8@120.94,52.105 ; IC47.8@210.251,57.654 v2(215.15,57.654)
  other v1: 87.984,37.282 136,87.1 136.8,87.1 138.4,87.1
P5V5: C33.2 C34.2 C35.2 C68.2 IC5.6 IC30.2 L9.2 L10.1 R28.2 R106.2 TP1.1 | length 26.4
  Top Layer w0.5: IC30.2@140.629,53.45 140.739,53.56 C68.2@142.98,53.56 v1(145.884,53.56) v1(146.745,53.56) v1(147.545,53.56)
  Bottom Layer w0.2: R106.2@144.756,78.137 145.676,78.137 145.699,78.16 145.969,78.16 TP1.1@146.745,77.384 ; TP1.1@146.745,77.405 TP1.1@146.936,77.215 ; TP1.1@147.127,77.024 TP1.1@146.936,77.215 ; IC5.6@151.58,82.597 151.599,82.616 151.599,83.459 151.918,83.778 R28.2@151.918,84.499 ; R28.2@151.918,84.647 R28.2@151.918,84.499 ; v1(152.869,78.084) 152.869,77.529 151.957,76.616 148.561,76.616 147.963,77.215 TP1.1@146.936,77.215 ; v1(157.961,82.322) 155.097,82.322 153.43,83.989 C34.2@153.43,84.499 R28.2@151.918,84.499
  other v1: 153.7,78.1 154.5,78.1 155.3,78.1 156.1,78.1 156.8,78.1 157.6,78.1
P5V5A: C97.2 IC31.2 | length 2.3
  Top Layer w0.2: C97.2@133.55,49.1 135.72,49.1 IC31.2@135.82,49
P12V0: C37.2 J9.28 J9.29 J13.A1 J13.D1 J13.E1 J13.G1 J13.H1 J13.J1 J13.K1 L8.1 R179.2 T6.1 T6.2 T6.3 | length 3.2
  Bottom Layer w0.2: J9.28@192.37,25.86 192.376,25.866 R179.2@195.587,25.866
  other v1: 138.1,75.8 138.9,75.8 139.7,75.8 140.5,75.8
P12V0_SW: C80.2 C81.2 C99.2 C101.2 C118.2 C119.2 C120.2 C121.2 C129.2 C130.2 C131.2 C132.2 D1.1 FL1.2 IC21.F10 IC21.F11 IC21.G10 IC21.G11 IC21.H10 IC21.H11 IC21.J10 IC21.J11 IC21.K10 IC21.K11 IC21.L9 IC21.L10 IC21.L11 IC22.F10 IC22.F11 IC22.G10 IC22.G11 IC22.H10 IC22.H11 IC22.J10 IC22.J11 IC22.K10 IC22.K11 IC22.L9 IC22.L10 IC22.L11 IC33.1 IC33.3 L7.1 L11.1 R51.2 R218.2 T6.5 T6.6 T6.7 T6.8 TP18.1 | length 0.7
  Bottom Layer w0.2: TP18.1@190.768,19.905 TP18.1@191.239,19.434
  other v1: 187.9,6.4 189.2,6.4 190.4,6.4 191.7,6.4 137.9,9.9 138.7,9.9 139.5,9.9 190.145,13.9 190.945,13.9 191.745,13.9 192.545,13.9 193.345,13.9 190.145,14.7 191.745,14.7 193.345,14.7 190.145,15.5 190.945,15.5 191.745,15.5 192.545,15.5 193.345,15.5 190.145,16.3 191.745,16.3 193.345,16.3 190.145,17.1 190.945,17.1 191.745,17.1 192.545,17.1 193.345,17.1 151.385,20.585 152.185,20.585 152.985,20.585 153.785,20.585 154.585,20.585 28.593,24.764 29.393,24.764 30.193,24.764 152.7,43.3 153.5,43.3 154.3,43.3 155.1,43.3 155.9,43.3 198.033,63.802 198.8,63.8 199.6,63.8 200.4,63.8 201.2,63.8 202,63.8 202.8,63.8
  other v2: 170.753,9.458 171.553,9.458 172.353,9.458
P12V0F: C38.2 IC5.1 IC5.8 L8.2 R17.2 | length 8.1
  Top Layer w0.2: v1(146.805,81.263) 146.807,81.261 147.53,81.261 v1(147.532,81.259)
  Bottom Layer w0.2: v1(146.1,81.263) v1(146.805,81.263) 146.807,81.261 147.53,81.261 v1(147.532,81.259) v1(147.532,81.259) 148.238,81.26 v1(148.239,81.261) 148.239,80.986 R17.2@148.524,80.7 148.524,80.647 IC5.1@151.33,80.647 152.08,80.647 IC5.8@152.08,79.697
P48V0_N: C123.2 C124.2 C125.2 C126.2 C127.2 C128.2 IC22.A1 IC22.A2 IC22.A3 IC22.A4 IC22.A5 IC22.A6 IC22.B1 IC22.B2 IC22.B3 IC22.B4 IC22.B5 IC22.B6 IC22.C1 IC22.C2 IC22.C3 IC22.C4 IC22.C5 IC22.C6 P4.3 R23.2 R76.2 R77.2 R123.I2 TP9.1 | length 7.3
  Bottom Layer w0.2: R23.2@34.43,62.855 TP9.1@36.26,62.855 36.26,59.518 36.377,59.401 v1(36.431,59.401) ; R77.2@163.14,62.543 163.18,62.503 v1(165.025,62.503)
  other v1: 166.102,52.849 167.002,52.849 167.802,52.849 168.602,52.849 169.402,52.849 170.102,52.849 170.902,52.849 166.102,53.649 167.002,53.649 167.802,53.649 168.602,53.649 169.402,53.649 170.202,53.649 170.902,53.649 34.031,59.401 34.831,59.401 35.631,59.401 37.231,59.401 34.031,60.301 34.831,60.301 35.631,60.301 36.431,60.301
P48V0_P: C91.2 C92.2 C94.2 C115.2 C116.2 C117.2 IC21.A1 IC21.A2 IC21.A3 IC21.A4 IC21.A5 IC21.A6 IC21.B1 IC21.B2 IC21.B3 IC21.B4 IC21.B5 IC21.B6 IC21.C1 IC21.C2 IC21.C3 IC21.C4 IC21.C5 IC21.C6 P3.3 R66.2 R67.2 R120.I2 R180.2 TP10.1 | length 18.8
  Bottom Layer w0.2: v1(44.686,42.492) 45.535,42.492 45.803,42.76 TP10.1@48.693,42.76 R180.2@48.693,40.957 ; R67.2@155.14,40.61 155.14,41.674 156.27,42.804 164.38,42.804 165.87,44.294
  other v1: 169.031,32.871 169.831,32.871 169.831,33.671 169.031,33.771 169.831,34.471 169.031,34.571 169.031,35.271 169.831,35.271 169.031,36.071 169.831,36.071 169.031,36.871 169.831,36.871 169.031,37.671 169.831,37.671 43.086,42.492 43.886,42.492 45.486,42.492 43.086,43.292 43.886,43.292 44.686,43.292 45.486,43.292
PA_DCDC_OFF: R2.1 R115.2 | length 2.8
  Top Layer w0.2: v1@167.871,81.572 R115.2@169.065,81.572 ; v1(209.749,43.614) R2.1@211.323,43.614
  other v1: 167.865,81.579
PGOOD: IC5.7 R97.2 TP24.1 | length 23.1
  Top Layer w0.2: v1(152.857,83.35) 152.085,82.578 152.085,72.457 152.595,71.947 TP24.1@157.36,71.947 TP24.1@159.36,71.947 R97.2@162.36,71.947
  Bottom Layer w0.2: IC5.7@152.08,82.597 152.625,82.597 152.857,82.829 v1(152.857,83.35)
PS_ON_BP: D2.2 IC32.5 IC32.6 IC32.12 IC32.13 IC35.3 R153.1 TP12.1 | length 73.6
  Top Layer w0.2: v1(198.472,25.911) 198.528,25.911 199.068,26.45 IC32.5@201.5,26.45 ; IC32.6@201.5,25.8 IC32.5@201.5,26.45 ; IC32.13@207.3,28.4 IC32.12@207.3,27.75 ; v1(213.529,25) 213.529,26.736 212.514,27.75 IC32.12@207.3,27.75 ; IC32.5@201.5,26.45 202.952,26.45 204.252,27.75 IC32.12@207.3,27.75
  Int1 (GND) w0.2: v3(204.266,47.8) 204.266,45.429 208.509,41.185 209.098,41.185 209.552,40.731 209.552,39.416 215.14,33.828 215.14,26.355 214.802,26.018 214.546,26.018 v1(213.529,25)
  Bottom Layer w0.2: R153.1@196.137,10.045 196.137,10.727 196.76,11.35 197.293,11.35 198.38,12.437 198.38,20.105 ; v1(198.472,25.911) 198.472,24.513 198.623,24.361 198.623,23.072 198.38,22.829 198.38,20.105 ; 198.519,13 D2.2@199.6,13 ; TP12.1@202.692,22.03 200.766,20.105 198.38,20.105 ; v3(204.266,47.8) 204.266,50.148 IC35.3@204.271,50.153
PWR_GA0: IC32.2 R145.2 | length 12.8
  Top Layer w0.2: v1(199.222,28.34) 199.252,28.37 201.47,28.37 IC32.2@201.5,28.4 ; v1(199.891,36.783) v1@199.894,36.78
  Int1 (GND) w0.2: v1(199.222,28.34) 199.891,29.009 v1(199.891,36.783)
  Bottom Layer w0.2: v1(199.891,36.783) R145.2@201.651,36.783
PWR_GA1: IC32.3 R148.2 | length 17.7
  Top Layer w0.2: v1(198.382,27.86) 198.452,27.79 201.46,27.79 IC32.3@201.5,27.75
  Int1 (GND) w0.2: v1(198.382,27.86) 198.382,36.052 200.595,38.265 v1(202.334,38.265)
  Bottom Layer w0.2: v1(202.334,38.265) 202.275,38.324 202.275,38.966 202.392,39.083 R148.2@203.001,39.083
PWR_GA2: IC32.9 R147.2 | length 17.4
  Top Layer w0.2: IC32.9@207.3,25.8 v1(208.589,25.8)
  Int1 (GND) w0.2: v1(205.101,39.473) 206.07,38.504 206.07,34.211 207.122,33.159 207.122,27.266 v1(208.589,25.8)
  Bottom Layer w0.2: R147.2@204.271,39.083 204.264,39.09 204.447,39.273 204.793,39.273 204.993,39.473 v1(205.101,39.473)
PWR_GA3: IC32.10 R146.2 | length 18.6
  Top Layer w0.2: IC32.10@207.3,26.45 207.31,26.46 209.44,26.46 v1(209.45,26.47)
  Int1 (GND) w0.2: v1(209.017,39.29) 208.334,39.29 207.262,38.218 207.262,34.816 208.824,33.254 208.824,30.319 209.081,30.062 209.081,26.839 v1(209.45,26.47)
  Bottom Layer w0.2: R146.2@207.601,39.753 208.554,39.753 v1(209.017,39.29)
RF_IN_N: C17.2 C74.1 R19.1 | length 47.9
  Top Layer w0.152: C17.2@112.458,34.34 112.461,34.343 112.461,35.129 112.764,35.129 113.518,35.883 113.518,36.447 113.429,36.536 v3(112.958,36.536)
  Top Layer w0.245: C74.1@94.095,48.796 94.095,51.231 R19.1@94.16,51.296 97.396,51.296 v3(102.86,56.76)
  Int1 (GND) w0.245: v3(102.86,56.76) 102.815,56.805 102.815,57.304 102.958,57.447 105.051,57.447 113.888,48.61 113.888,38.3 112.456,36.868 112.456,34.046 112.065,33.656 112.05,33.656
RF_IN_P: C8.1 C21.2 R12.1 | length 48.3
  Top Layer w0.152: v3(114.38,36.536) 113.909,36.536 113.82,36.447 113.82,35.819 114.509,35.129 114.834,35.129 114.923,35.04 114.923,34.375 C21.2@114.958,34.34
  Top Layer w0.245: C8.1@94.6,66.8 94.6,64.356 R12.1@94.66,64.296 97.104,64.296 v3(102.77,58.63)
  Int1 (GND) w0.245: v3(102.77,58.63) 102.815,58.585 102.815,58.086 102.958,57.942 105.256,57.942 114.383,48.816 114.383,38.095 112.951,36.663 112.951,34.162 113.457,33.656 113.472,33.656
RF_OFF: IC24_VHF_FWD_RFD.4 PB1.3 TP28.1 | length 167.7
  Top Layer w0.2: v1(119.5,69.361) 120.04,68.82 123.862,68.82 125.487,70.445 125.487,79.413 125.362,79.538 125.362,87.434 121.396,91.4 v1(119.816,91.4) ; v1(212.416,61.252) 214.183,61.252
  Top Layer w0.3: v1(212.692,45.074) PB1.3@214.197,45.074
  Bottom Layer w0.2: TP28.1@118.065,70.672 118.065,69.798 118.502,69.361 v1(119.5,69.361) IC24_VHF_FWD_RFD.4@120.756,69.361 ; v1(119.816,91.4) 120.566,90.65 162.122,90.65 172.407,80.365 174.455,80.365 175.269,79.55 176.028,79.55 182.05,73.528 182.05,70.745 186.459,66.336 213.147,66.336 213.264,66.219 213.264,62.1 v1(212.416,61.252) 215.7,57.969 215.7,48.082 v1(212.692,45.074)
RST_DIOT: IC38.4 IC44.1 | length 4.2
  Bottom Layer w0.2: IC38.4@167.598,26.95 167.598,26.309 167.715,26.191 171.068,26.191